# Altium PCB Phaser.PcbDoc (part 7 of 16)
Units mm, origin at the board's own origin, x right, y up, seen from the top; angles counter-clockwise.
Board outline 161.99 x 100 mm, 6 copper layers (TopLayer, MidLayer1, MidLayer2, SignalLayer1, Internal Plane 1, BottomLayer), stack 1.528 mm thick; 1017 components, 665 nets, 3453 pads, 2223 vias.
Unrouted connection lines stored in the file: 1.
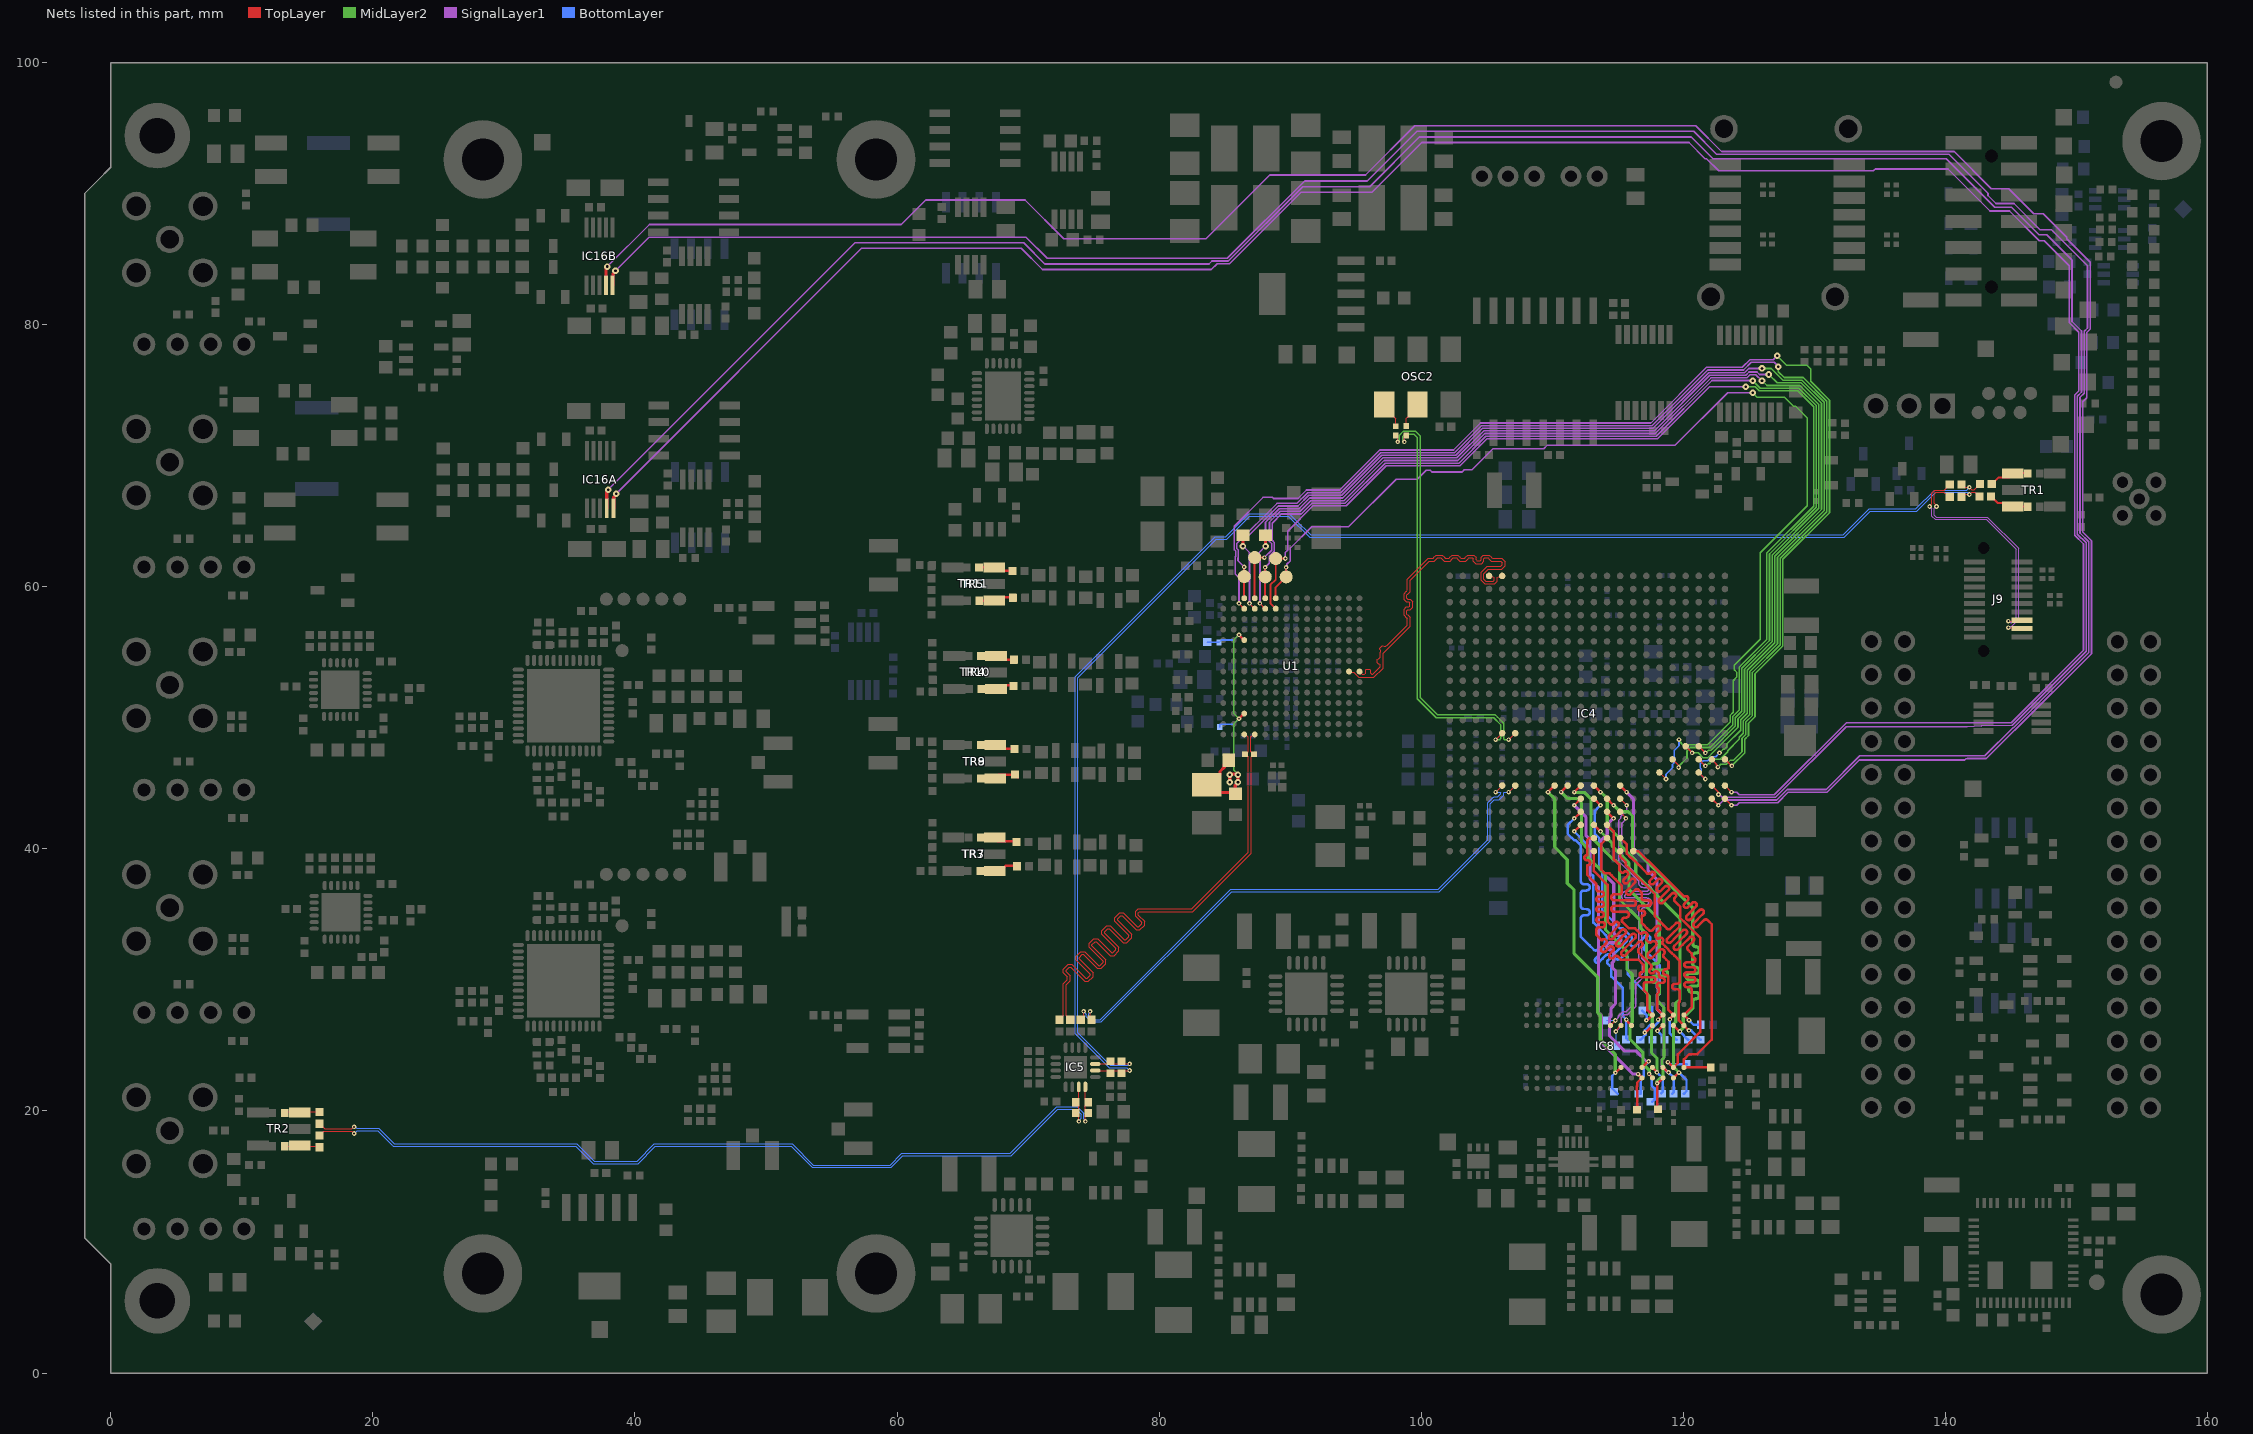
[diagram p9: the nets of this part, all layers, seen from the top]

## Via types
v1: diameter 0.5, hole 0.2, TopLayer to BottomLayer, tented both sides, 1374 vias
v2: diameter 0.35, hole 0.15, TopLayer to BottomLayer, tented both sides, 728 vias
v3: diameter 0.5, hole 0.2, TopLayer to BottomLayer, tented top, 96 vias
v4: diameter 0.6, hole 0.3, TopLayer to BottomLayer, 18 vias
v5: diameter 0.5, hole 0.2, TopLayer to BottomLayer, 5 vias
v6: diameter 0.35, hole 0.15, TopLayer to BottomLayer, 1 vias
v7: diameter 0.8, hole 0.5, TopLayer to BottomLayer, tented both sides, 1 vias

## Nets (pads, with @x,y where several pads share a name; then routed paths per layer and width w, separated by ;. In a path a pad name is that pad's centre, name@x,y a point inside that pad or via, vN(x,y) a via of type N, cw(c..) or ccw(c..) an arc to the next point about the centre after c; other vN are vias at no path point) (continued)
CH0_GAIN_A0: IC4.AB5 IC16B.4 | length 189.2
  TopLayer w0.125: IC4.AB5@123.175,43.825 v2(123.675,43.325)
  TopLayer w0.25: IC16B.4@37.8,83.005 37.8,84.33 v1(37.9,84.43)
  SignalLayer1 w0.127: v1(37.9,84.43) 41.107,87.637 60.32,87.637 62.196,89.512 69.769,89.512 72.724,86.558 83.575,86.558 88.431,91.415 95.747,91.415 99.499,95.167 120.955,95.167 122.917,93.204 140.664,93.204 143.501,90.367 144.837,90.367 146.744,88.46 147.471,88.46 149.259,86.671 149.259,86.545 151.047,84.756 151.047,79.66 150.788,79.401 150.788,74.427 150.474,74.113 150.474,64.18 151.142,63.512 151.142,54.895 145.286,49.039 145.27,49.039 143.119,46.887 141.661,46.887 ccw(c141.661,46.76) 141.586,46.863 141.468,46.777 133.425,46.777 130.977,44.329 128.005,44.329 127.2,43.524 124.269,43.524 124.07,43.325 v2(123.675,43.325)
CH0_GAIN_A1: IC4.AA5 IC16B.5 | length 187.3
  TopLayer w0.125: IC4.AA5@122.175,43.825 v2(122.675,43.325)
  TopLayer w0.25: IC16B.5@38.3,83.005 38.325,83.03 38.325,83.86 38.517,84.052 v1(38.517,84.12)
  SignalLayer1 w0.127: v1(38.517,84.12) 41.068,86.671 69.835,86.671 71.45,85.055 85.2,85.055 91.102,90.957 95.884,90.957 99.673,94.746 120.782,94.746 122.527,93.001 140.273,93.001 143.248,90.026 143.248,89.856 143.861,89.243 145.225,89.243 147.218,87.249 148.097,87.249 150.844,84.502 150.844,79.744 150.585,79.485 150.585,74.771 150.271,74.457 150.271,64.096 150.939,63.428 150.939,54.979 145.218,49.258 ; v2(122.675,43.325) 123.077,43.727 127.116,43.727 127.921,44.532 130.893,44.532 133.451,47.09 143.003,47.09 145.133,49.221
CH1_GAIN_A0: IC4.AA6 IC16A.4 | length 193.7
  TopLayer w0.125: IC4.AA6@122.175,44.825 122.639,44.361 122.639,44.188 v2(122.682,44.145)
  TopLayer w0.25: IC16A.4@37.85,65.98 37.85,67.305 v1(37.95,67.405)
  SignalLayer1 w0.127: v1(37.95,67.405) 56.789,86.244 69.658,86.244 71.274,84.628 83.809,84.628 84.033,84.852 85.284,84.852 90.962,90.53 96.061,90.53 99.85,94.319 120.605,94.319 122.26,92.664 140.051,92.664 143.764,88.951 145.04,88.951 147.137,86.854 147.723,86.854 149.627,84.95 149.651,84.917 149.652,84.874 149.652,80.243 150.382,79.513 150.382,74.855 150.067,74.541 150.067,64.012 150.736,63.343 150.736,55.063 145.135,49.463 cw(c145.045,49.553) 145.048,49.426 142.74,49.378 141.664,49.317 132.419,49.317 127.031,43.93 122.957,43.93 122.742,44.145 v2(122.682,44.145)
CH1_GAIN_A1: IC4.AB6 IC16A.5 | length 190.8
  TopLayer w0.125: IC4.AB6@123.175,44.825 v2(123.675,44.325)
  TopLayer w0.25: IC16A.5@38.375,66.005 38.375,66.835 38.567,67.027 v1(38.567,67.095)
  SignalLayer1 w0.127: v1(38.567,67.095) 57.289,85.817 69.481,85.817 71.097,84.201 83.986,84.201 84.434,84.649 85.368,84.649 90.823,90.103 96.238,90.103 100.027,93.892 120.428,93.892 121.657,92.664 121.767,92.664 122.694,91.737 129.656,91.737 129.661,91.732 134.492,91.732 134.635,91.875 140.189,91.875 143.392,88.672 144.881,88.672 147.159,86.394 147.537,86.394 149.449,84.482 149.449,80.158 150.178,79.429 150.178,74.939 149.864,74.625 149.864,63.928 150.533,63.259 150.533,55.147 145.015,49.63 132.444,49.63 126.947,44.133 124.262,44.133 124.07,44.325 v2(123.675,44.325)
CK_GTP_125_N: C237.1 OSC2.5 | length 2
  TopLayer w0.095: C237.1@98.856,72.25 98.856,72.84 98.993,72.977 99.721,73.705 OSC2.5@99.721,73.905
CK_GTP_125_P: C236.1 OSC2.4 | length 2
  TopLayer w0.095: OSC2.4@97.181,73.905 97.181,73.705 OSC2.4@97.908,72.977 ; OSC2.4@97.909,72.977 98.056,72.831 C236.1@98.056,72.245
CK_GTP_N: C26.2 IC4.E6 | length 42.6
  TopLayer w0.095: v2(74.738,27.591) 74.738,27.18 C26.2@74.958,26.96 ; v2(105.675,44.325) IC4.E6@106.175,44.825
  BottomLayer w0.095: v2(74.738,27.591) 74.738,27.522 74.624,27.409 74.624,27.255 74.905,26.975 75.514,26.975 85.453,36.914 101.289,36.914 105.084,40.709 105.084,43.52 105.502,43.939 105.546,43.939 105.582,43.975 105.853,43.975 106.069,44.191 106.069,44.269 106.013,44.325 v2@105.679,44.325
CK_GTP_P: C27.2 IC4.F6 | length 43.3
  TopLayer w0.095: C27.2@74.018,26.96 74.238,27.18 v2(74.238,27.591) ; v2(106.675,44.325) IC4.F6@107.175,44.825
  BottomLayer w0.095: v2(74.238,27.591) 74.238,27.564 74.44,27.362 74.44,27.179 74.775,26.845 74.828,26.791 75.59,26.791 85.529,36.73 101.365,36.73 105.267,40.633 105.267,43.444 105.521,43.697 105.524,43.697 105.582,43.755 105.944,43.755 106.289,44.1 106.289,44.269 106.344,44.325 v2(106.675,44.325)
CK_MMCX_IN_N: C194.1 R45.2 TR1.1 | length 3.1
  TopLayer w0.152: C194.1@143.485,66.875 143.719,66.641 143.744,66.641 143.997,66.388 144.87,66.388 TR1.1@145.148,66.11 146.263,66.11 R45.2@146.267,66.105
CK_MMCX_IN_P: C189.1 R73.2 TR1.3 | length 3.1
  TopLayer w0.152: C189.1@143.531,67.842 143.765,68.076 143.791,68.076 144.06,68.345 144.31,68.345 ; 144.31,68.346 144.844,68.346 145.158,68.66 146.252,68.66 R73.2@146.267,68.645
CK_MMCX_N: C194.2 C362.2 IC5.7 R47.1 R163.2 | length 112
  TopLayer w0.095: IC5.7@75.118,23.585 76.073,23.585 R47.1@76.293,23.805 76.513,23.585 76.898,23.585 R163.2@77.118,23.805 77.338,23.585 v2(77.749,23.585) ; C362.2@141.278,66.875 141.44,67.038 v2(141.828,67.038) 142.013,67.222 142.238,67.222 C194.2@142.585,66.875
  BottomLayer w0.095: v2(77.749,23.585) 77.636,23.471 76.274,23.471 73.787,25.958 73.787,53.036 84.364,63.613 85.151,63.613 86.926,65.388 89.864,65.388 91.48,63.772 132.288,63.772 134.267,65.752 137.811,65.752 139.253,67.195 141.645,67.195 141.802,67.038 v2(141.828,67.038)
CK_MMCX_P: C189.2 C359.2 IC5.6 R47.2 R163.1 | length 112.9
  TopLayer w0.095: IC5.6@75.118,23.085 76.073,23.085 R47.2@76.293,22.865 76.513,23.085 76.898,23.085 R163.1@77.118,22.865 77.338,23.085 v2(77.749,23.085) ; C359.2@141.231,67.842 141.483,67.591 v2(141.828,67.591) 142.013,67.406 142.195,67.406 C189.2@142.631,67.842
  BottomLayer w0.095: v2(77.749,23.085) 77.723,23.085 77.52,23.287 76.197,23.287 73.603,25.881 73.603,53.112 84.288,63.797 85.075,63.797 86.85,65.572 89.94,65.572 90.399,65.113 91.556,63.956 132.211,63.956 134.191,65.936 137.735,65.936 139.177,67.379 141.616,67.379 v2(141.828,67.591)
CK_SMA_IN_N: C81.1 R245.2 TR2.1 | length 2.7
  TopLayer w0.095: R245.2@13.27,19.845 13.35,19.925 C81.1@15.925,19.925
CK_SMA_IN_P: C54.1 R46.2 TR2.3 | length 2.7
  TopLayer w0.095: R46.2@13.27,17.3 14.385,17.3 14.39,17.305 15.845,17.305 C54.1@15.925,17.225
CK_SMA_N: C81.2 IC5.4 R22.2 R52.1 | length 66.5
  TopLayer w0.095: C81.2@15.925,19.025 16.328,18.622 18.392,18.622 18.55,18.78 v2(18.575,18.78) ; v2(74.368,19.203) 74.368,19.615 R22.2@74.588,19.835 74.368,20.055 74.368,20.44 R52.1@74.588,20.66 74.368,20.88 IC5.4@74.368,21.835
  BottomLayer w0.095: v2(18.575,18.78) 18.644,18.78 18.758,18.667 ; 18.811,18.667 20.457,18.667 20.516,18.607 21.642,17.481 35.556,17.481 36.879,16.158 40.161,16.158 41.484,17.481 52.013,17.481 53.621,15.873 59.475,15.873 60.362,16.76 68.621,16.76 72.186,20.325 73.739,20.325 74.254,19.81 74.254,19.385 74.368,19.272 v2(74.368,19.203)
CK_SMA_P: C54.2 IC5.3 R22.1 R52.2 | length 66.3
  TopLayer w0.095: C54.2@15.925,18.125 16.239,18.438 18.392,18.438 18.55,18.28 v2(18.575,18.28) ; v2(73.868,19.203) 73.868,19.615 R22.1@73.648,19.835 73.868,20.055 73.868,20.44 R52.2@73.648,20.66 73.868,20.88 IC5.3@73.868,21.835
  BottomLayer w0.095: v2(18.575,18.28) 18.602,18.28 18.804,18.483 20.381,18.483 21.489,17.374 ; 21.502,17.361 21.566,17.297 35.48,17.297 36.534,16.243 36.803,15.974 40.237,15.974 41.56,17.297 51.937,17.297 53.545,15.69 59.551,15.69 60.438,16.576 68.697,16.576 72.262,20.142 73.663,20.142 74.07,19.734 74.07,19.432 73.868,19.23 v2(73.868,19.203)
CKC_GTP_125_N: C237.2 IC4.E10 | length 31.7
  TopLayer w0.095: v2(98.706,71.052) 98.706,71.4 C237.2@98.856,71.55 ; v2(105.675,48.325) IC4.E10@106.175,48.825
  MidLayer2 w0.115: v2(98.706,71.052) 98.706,71.105 98.573,71.237 98.573,71.462 98.75,71.639 99.453,71.639 99.534,71.558 99.695,71.396 99.695,51.452 100.465,50.683 101.146,50.001 105.54,50.001 106.057,49.483 106.057,48.392 105.99,48.325 v2(105.675,48.325)
CKC_GTP_125_P: C236.2 IC4.F10 | length 32.4
  TopLayer w0.095: C236.2@98.056,71.545 98.206,71.395 v2(98.206,71.052) ; v2(106.675,48.325) IC4.F10@107.175,48.825
  MidLayer2 w0.115: v2(98.206,71.052) 98.206,71.105 98.338,71.237 98.338,71.559 98.653,71.874 99.55,71.874 99.93,71.494 99.93,51.55 101.244,50.236 105.637,50.236 105.818,50.055 106,49.874 106.292,49.581 106.292,48.392 106.36,48.325 v2(106.675,48.325)
CLKVDD1.2: C144.2 C304.2 C305.1 C306.2 C307.2 L11.1 U1.C12 U1.K12 | length 24.8
  TopLayer w0.2: v2(86.093,49.925) U1.C12@86.493,50.325 ; v2(86.093,56.325) U1.K12@86.493,55.925
  TopLayer w0.25: C306.2@85.318,46.75 84.968,46.4 84.968,46.224 84.644,45.9 84.644,45.675 83.869,44.9 C305.1@83.644,44.9 84.244,44.3 85.815,44.3 85.815,44.867 v1(86.013,45.066) v1@86.013,45.675 ; v1@85.349,45.066 85.378,45.095 v1@85.378,45.675 ; v1@85.378,45.701 v1@85.378,45.675 ; v1@86.013,45.701 85.404,45.701 v1@85.378,45.675
  MidLayer2 w0.125: v1@86.013,45.701 85.695,46.02 85.695,49.527 v2(86.093,49.925) 85.695,50.323 85.695,55.927 v2(86.093,56.325)
  BottomLayer w0.125: C307.2@83.671,55.775 83.696,55.75 C144.2@84.571,55.75 84.759,55.937 85.705,55.937 v2(86.093,56.325) ; C304.2@84.621,49.3 84.621,49.512 85.68,49.512 v2(86.093,49.925)
  other v1: 85.378,45.066 85.378,45.65 86.013,45.65
CPCIS_CLK_N: C362.1 J9.17 | length 18.2
  TopLayer w0.095: v2(139.318,66.121) 139.318,66.19 139.129,66.38 139.129,67.07 139.253,67.195 139.878,67.195 139.943,67.129 140.063,67.129 C362.1@140.325,66.867 ; v2(144.805,56.872) 145.758,56.872 J9.17@145.825,56.805
  SignalLayer1 w0.095: v2(139.318,66.121) 139.273,66.121 139.141,65.989 139.141,65.462 139.288,65.316 143.2,65.316 145.58,62.936 145.58,57.52 145.059,56.999 145.001,56.999 144.874,56.872 v2(144.805,56.872)
CPCIS_CLK_P: C359.1 J9.15 | length 18.2
  TopLayer w0.095: v2(138.793,66.121) 138.793,66.19 138.945,66.342 138.945,67.146 139.177,67.379 139.908,67.379 C359.1@140.325,67.795 ; v2(144.805,57.373) 145.758,57.373 J9.15@145.825,57.44
  SignalLayer1 w0.095: v2(138.793,66.121) 138.838,66.121 138.97,65.989 138.97,65.391 139.217,65.144 143.129,65.144 145.409,62.865 145.409,57.591 145.063,57.245 144.985,57.245 144.857,57.373 v2(144.805,57.373)
DAC_ALARM: IC4.AB8 U1.N12 | length 91.2
  TopLayer w0.125: v2(86.093,58.725) U1.N12@86.493,58.325 ; IC4.AB8@123.175,46.825 123.186,46.825 123.687,46.325 v2(123.698,46.325)
  MidLayer2 w0.125: v2(123.698,46.325) 123.698,46.334 124.679,47.315 124.679,48.352 124.973,48.647 124.973,49.591 125.471,50.089 125.471,53.368 127.584,55.481 127.584,62.085 131.146,65.647 131.146,74.239 129.716,75.67 129.716,76.441 129.708,76.448 129.708,76.632 129.437,76.903 127.872,76.903 v1(127.152,77.622)
  SignalLayer1 w0.125: v2(86.093,58.725) 86.093,60.694 85.813,60.974 85.813,62.299 85.84,62.326 85.84,62.718 85.731,62.827 85.731,64.617 87.929,66.814 88.645,66.814 88.73,66.729 90.6,66.729 91.246,67.375 93.772,67.375 96.831,70.434 102.458,70.434 104.514,72.491 117.524,72.491 121.77,76.736 124.505,76.736 125.088,77.319 126.849,77.319 v1(127.152,77.622)
DAC_CLK_N: C3.2 R88.2 U1.A11 | length 46.4
  TopLayer w0.095: C3.2@73.218,26.96 72.915,27.262 72.915,29.625 72.994,29.704 73.22,29.93 73.22,30.311 72.909,30.622 72.909,30.723 73.145,30.958 73.245,30.958 74.312,29.891 74.595,29.891 74.959,30.255 74.959,30.538 73.892,31.605 73.892,31.705 74.127,31.941 74.228,31.941 75.295,30.874 75.578,30.874 75.942,31.238 75.942,31.521 74.875,32.588 74.875,32.688 75.11,32.923 75.211,32.923 76.278,31.857 76.561,31.857 76.925,32.221 76.925,32.504 75.858,33.57 75.858,33.671 76.093,33.906 76.194,33.906 77.261,32.84 77.544,32.84 77.908,33.203 77.908,33.487 76.841,34.553 76.841,34.654 77.076,34.889 77.177,34.889 78.244,33.822 78.527,33.822 78.891,34.186 78.891,34.469 78.424,34.936 78.424,35.134 78.504,35.214 82.573,35.214 87.013,39.654 87.013,47.025 87.213,47.225 87.203,47.225 87.003,47.425 87.003,47.729 87.003,48.457 87.003,48.536 87.058,48.592 87.063,48.592 87.197,48.725 U1.A11@87.293,48.725
DAC_CLK_P: C4.2 R88.1 U1.A12 | length 46.4
  TopLayer w0.095: C4.2@72.393,26.96 72.695,27.262 72.695,29.716 72.76,29.781 72.839,29.86 73,30.021 73,30.22 72.689,30.531 72.689,30.814 73.053,31.178 73.336,31.178 74.403,30.111 74.504,30.111 74.739,30.346 74.739,30.447 73.672,31.513 73.672,31.797 74.036,32.161 74.319,32.161 75.386,31.094 75.487,31.094 75.722,31.329 75.722,31.43 74.655,32.496 74.655,32.779 75.019,33.143 75.302,33.143 76.369,32.077 76.47,32.077 76.705,32.312 76.705,32.413 75.638,33.479 75.638,33.762 76.002,34.126 76.285,34.126 77.352,33.06 77.453,33.06 77.688,33.295 77.688,33.395 76.621,34.462 76.621,34.745 76.985,35.109 77.268,35.109 78.335,34.042 78.435,34.042 78.671,34.278 78.671,34.378 78.204,34.844 78.204,35.226 78.348,35.369 78.412,35.434 82.481,35.434 86.793,39.745 86.793,47.025 R88.1@86.593,47.225 ; U1.A12@86.493,48.725 86.589,48.725 86.722,48.592 86.727,48.592 86.783,48.536 86.783,48.366 86.783,47.638 86.783,47.425 R88.1@86.583,47.225
DAC_OUTA_N: R2.2 R39.2 R269.1 TR3.1 TR7.1 | length 2.9
  TopLayer w0.19: R39.2@68.875,40.572 67.746,40.572 TR3.1@67.461,40.857 R2.2@66.621,40.857 ; R39.2@69.125,40.526 R39.2@69.125,40.566 ; R2.2@66.621,40.857 R2.2@66.392,40.857 R2.2@66.621,40.857
DAC_OUTA_P: R37.2 R59.2 R248.1 TR3.3 TR7.3 | length 3.4
  TopLayer w0.19: R248.1@69.062,38.783 R37.2@69.171,38.673 R248.1@69.128,38.63 ; R248.1@69.149,38.698 68.288,38.698 67.906,38.317 TR3.3@67.461,38.317 R59.2@66.57,38.317 ; R59.2@66.57,38.317 R59.2@66.341,38.317 R59.2@66.57,38.317
DAC_OUTB_N: R50.2 R54.2 R271.1 TR8.3 TR9.3 | length 3.1
  TopLayer w0.19: R271.1@68.889,45.663 67.787,45.663 TR9.3@67.502,45.378 R50.2@66.611,45.378 ; R271.1@69.022,45.661 R54.2@69.022,45.659 R271.1@69.228,45.453 ; R50.2@66.611,45.378 R50.2@66.382,45.378 R50.2@66.611,45.378
DAC_OUTB_P: R32.2 R40.2 R270.1 TR8.1 TR9.1 | length 3.3
  TopLayer w0.19: R32.2@66.382,47.918 66.611,47.918 TR9.1@67.502,47.918 67.777,47.643 68.455,47.643 68.479,47.62 68.86,47.62 R270.1@68.939,47.699 ; R270.1@68.817,47.788 68.887,47.718 R40.2@68.98,47.625 68.98,47.718 R270.1@68.98,47.811 ; R270.1@68.96,47.703 68.964,47.703 69.026,47.765 R270.1@69.09,47.83
DAC_OUTC_N: R66.2 R67.2 R273.1 TR4.1 TR10.1 | length 3.4
  TopLayer w0.19: R273.1@68.705,54.44 67.813,54.44 TR4.1@67.528,54.725 R66.2@66.637,54.725 ; R273.1@68.97,54.424 R273.1@68.97,54.486 ; R66.2@66.408,54.725 R66.2@66.637,54.725 ; R66.2@66.408,54.725 R66.2@66.637,54.725 ; R66.2@66.408,54.725 R66.2@66.637,54.725 ; R273.1@68.803,54.59 R67.2@68.938,54.455 R273.1@68.803,54.59 ; R273.1@68.803,54.59 68.77,54.59 R273.1@68.803,54.59
DAC_OUTC_P: R61.2 R62.2 R272.1 TR4.3 TR10.3 | length 2.7
  TopLayer w0.19: R62.2@66.433,52.185 TR4.3@67.528,52.185 67.813,52.47 R272.1@68.772,52.47 ; R272.1@68.888,52.418 R272.1@69.077,52.229
DAC_OUTD_N: R85.2 R86.2 R275.1 TR5.3 TR11.3 | length 3.8
  TopLayer w0.19: R85.2@66.278,58.928 66.508,58.928 TR5.3@67.424,58.928 ; R275.1@68.612,59.213 TR11.3@67.709,59.213 ; R275.1@68.837,59.158 68.837,59.138 R275.1@69.05,58.925 ; TR5.3@67.424,58.928 TR11.3@67.709,59.213 ; TR5.3@67.424,58.928 TR11.3@67.709,59.213 ; R275.1@68.644,58.946 R86.2@68.857,59.158 R275.1@68.644,58.946
DAC_OUTD_P: R76.2 R77.2 R274.1 TR5.1 TR11.1 | length 2.7
  TopLayer w0.19: R77.2@66.253,61.468 66.482,61.468 TR5.1@67.424,61.468 ; TR11.1@67.41,61.484 67.685,61.209 R274.1@68.534,61.209 ; R274.1@68.661,61.348 R76.2@68.824,61.185 ; R274.1@68.804,61.185 R274.1@68.804,61.205
DAC_RESETB: IC4.Y7 R36.1 U1.N10 | length 89.8
  TopLayer w0.125: v2(87.693,58.725) U1.N10@88.093,58.325 ; IC4.Y7@121.175,45.825 v2(121.675,45.325)
  TopLayer w0.25: v1(88.12,63.102) R36.1@88.12,63.927
  MidLayer2 w0.125: v2(122.758,47.325) 123.018,47.585 123.099,47.585 123.306,47.791 123.306,47.994 124.37,49.058 124.37,49.841 124.867,50.339 124.867,53.618 126.981,55.731 126.981,62.335 130.543,65.897 130.543,73.989 128.975,75.557 127.156,75.557 v1(126.52,76.193)
  SignalLayer1 w0.125: v2(87.693,58.725) 87.693,62.008 87.636,62.064 87.636,62.618 v1(88.12,63.102) 88.12,64.912 89.162,65.954 90.678,65.954 91.496,66.772 94.022,66.772 97.081,69.831 102.708,69.831 104.764,71.887 117.774,71.887 122.02,76.133 124.755,76.133 125.009,76.386 125.616,76.386 125.81,76.193 v1(126.52,76.193)
  BottomLayer w0.125: v2(121.675,45.325) 121.361,45.639 121.361,46.091 121.288,46.164 121.288,46.485 121.515,46.712 121.871,46.712 122.174,47.015 122.467,47.015 122.758,47.307 v2(122.758,47.325)
DAC_SCLK: B9.1 IC4.U7 U1.P9 | length 84.3
  TopLayer w0.125: IC4.U7@118.175,45.825 v2(118.675,45.325)
  TopLayer w0.152: U1.P9@88.893,59.125 88.892,59.126 88.892,59.949 B9.1@89.693,60.75 v2(89.693,61.481)
  MidLayer2 w0.125: v2(119.669,48.325) 119.669,48.264 119.824,48.109 119.824,48.056 119.943,47.937 121.836,47.937 123.565,49.667 123.565,50.174 123.805,50.414 123.805,52.833 124.063,53.091 124.063,53.486 123.884,53.664 123.884,54.001 125.866,55.983 125.866,62.594 129.45,66.178 129.45,72.877 128.568,73.758 128.42,73.758 127.734,74.444 125.638,74.444 v1(125.284,74.798)
  SignalLayer1 w0.125: v2(89.693,61.481) 89.732,61.52 89.732,61.705 90.016,61.989 90.016,62.957 91.634,64.575 94.45,64.575 98.082,68.207 99.706,68.207 100.375,68.876 100.696,68.876 100.818,68.754 103.125,68.754 103.292,68.922 103.866,68.922 105.478,70.533 109.353,70.533 109.628,70.808 119.393,70.808 123.383,74.798 v1(125.284,74.798)
  BottomLayer w0.125: v2(118.675,45.325) 118.675,45.69 119.17,46.185 119.17,46.439 119.319,46.588 119.319,46.985 119.297,47.007 119.297,47.499 119.669,47.871 v2(119.669,48.325)
DAC_SDENB: B12.1 IC4.Y9 U1.P10 | length 83.7
  TopLayer w0.125: IC4.Y9@121.175,47.825 v2(121.675,47.325)
  TopLayer w0.152: U1.P10@88.093,59.125 B12.1@88.093,60.75 v2(88.093,61.481)
  MidLayer2 w0.125: v2(121.675,47.325) 121.736,47.325 121.946,47.535 122.136,47.535 123.967,49.367 123.967,50.008 124.465,50.505 124.465,53.784 126.578,55.898 126.578,62.502 130.14,66.064 130.14,73.823 128.809,75.154 125.866,75.154 125.298,75.723 v1(125.284,75.723)
  SignalLayer1 w0.125: v2(88.093,61.481) 88.411,61.8 88.411,62.328 88.784,62.7 88.784,63.377 88.625,63.536 88.625,64.847 89.329,65.551 90.845,65.551 91.663,66.369 94.188,66.369 97.248,69.428 102.874,69.428 104.931,71.485 117.941,71.485 122.186,75.73 v1@125.284,75.73
DAC_SDIO: B10.1 IC4.W9 U1.P11 | length 86.9
  TopLayer w0.125: IC4.W9@120.175,47.825 v2(120.675,47.325)
  TopLayer w0.152: U1.P11@87.293,59.125 B10.1@87.293,62.225 v2(88.024,62.225)
  MidLayer2 w0.125: v2(120.675,47.325) 121.127,47.325 121.515,46.937 121.836,46.937 122.371,47.473 122.371,47.486 124.169,49.283 124.169,49.924 124.666,50.422 124.666,53.701 126.779,55.814 126.779,62.419 130.342,65.981 130.342,73.906 128.892,75.356 126.376,75.356 v1(126.001,75.73)
  SignalLayer1 w0.125: v2(88.024,62.225) 88.583,62.784 88.583,63.293 88.424,63.452 88.424,64.931 89.245,65.752 90.761,65.752 91.58,66.57 94.105,66.57 97.164,69.63 102.791,69.63 104.848,71.686 117.858,71.686 122.103,75.931 124.839,75.931 125.092,76.185 125.533,76.185 125.726,75.992 125.74,75.992 v1(126.001,75.73)
DAC_SDO: B11.1 IC4.AA8 U1.P12 | length 89.2
  TopLayer w0.125: IC4.AA8@122.175,46.825 122.175,46.818 122.53,46.464 122.53,46.39 122.631,46.289 v2(122.631,46.228)
  TopLayer w0.152: U1.P12@86.493,59.125 B11.1@86.493,60.775 v2(86.493,61.506)
  MidLayer2 w0.125: v2(122.631,46.228) 122.86,46.457 123.277,46.457 123.591,46.771 123.849,46.771 124.478,47.4 124.478,48.436 124.772,48.73 124.772,49.674 125.27,50.172 125.27,53.451 127.383,55.564 127.383,62.169 130.945,65.731 130.945,74.156 129.142,75.959 127.693,75.959 127.249,76.403 v1(127.249,76.797)
  SignalLayer1 w0.125: v2(86.493,61.506) 86.014,61.984 86.014,62.216 86.042,62.243 86.042,62.801 85.933,62.91 85.933,63.293 88.995,66.356 90.511,66.356 91.329,67.174 93.855,67.174 96.914,70.233 102.541,70.233 104.597,72.29 117.608,72.29 121.853,76.535 124.589,76.535 125.171,77.118 126.929,77.118 v1(127.249,76.797)
DAC_SLEEP: IC4.Y8 R231.1 U1.N11 | length 89.8
  TopLayer w0.125: v2(86.893,58.725) U1.N11@87.293,58.325 ; IC4.Y8@121.175,46.825 v2(121.675,46.325)
  TopLayer w0.25: v1(86.395,63.102) R231.1@86.395,63.927
  MidLayer2 w0.125: v2(121.675,46.325) 121.736,46.325 121.922,46.511 122.036,46.511 122.369,46.844 122.825,46.844 123.387,47.405 123.387,47.486 124.277,48.375 124.277,48.519 124.571,48.813 124.571,49.758 125.069,50.255 125.069,53.534 127.182,55.648 127.182,62.252 130.744,65.814 130.744,74.073 129.059,75.758 127.609,75.758 126.789,76.579 126.712,76.655 v1(126.001,76.655)
  SignalLayer1 w0.125: v2(86.893,58.725) 86.893,62.604 v1(86.395,63.102) 86.395,63.471 89.079,66.155 90.595,66.155 91.413,66.973 93.938,66.973 96.998,70.032 102.624,70.032 104.681,72.089 117.691,72.089 121.936,76.334 124.672,76.334 124.993,76.655 v1(126.001,76.655)
DAC_TXENA: B13.1 IC4.V8 U1.N9 | length 85.9
  TopLayer w0.125: IC4.V8@119.175,46.825 119.642,46.358 v2@119.642,46.195
  TopLayer w0.152: U1.N9@88.893,58.325 88.494,58.723 88.494,60.142 88.898,60.545 88.898,62.15 v2(89.629,62.15)
  MidLayer2 w0.125: v2(119.634,46.203) 119.677,46.246 119.677,46.327 120.274,46.924 120.274,47.471 120.538,47.736 122.052,47.736 123.766,49.45 123.766,50.091 124.264,50.589 124.264,53.868 126.377,55.981 126.377,62.585 129.939,66.147 129.939,73.726 128.722,74.942 125.793,74.942 125.476,75.26 v1(124.765,75.26)
  SignalLayer1 w0.125: v2(89.629,62.15) 89.629,62.611 89.809,62.792 89.809,64.231 91.746,66.168 94.272,66.168 97.331,69.227 102.958,69.227 105.014,71.284 118.024,71.284 122.001,75.26 v1(124.765,75.26)
DATA_CLK_N: IC4.D22 U1.G1 | length 25
  TopLayer w0.095: U1.G1@95.297,53.525 95.515,53.306 95.614,53.306 95.661,53.306 95.756,53.401 95.756,53.645 95.813,53.702 96.079,53.702 96.136,53.645 96.136,53.401 96.231,53.306 96.287,53.306 96.868,53.888 96.868,53.992 96.868,54.04 96.773,54.135 96.708,54.135 96.651,54.192 96.651,54.458 96.708,54.515 96.773,54.515 96.868,54.61 96.868,54.678 96.868,55.004 96.902,55.038 96.902,55.172 96.836,55.238 96.836,55.318 97.024,55.507 97.105,55.507 97.171,55.441 97.305,55.441 97.453,55.589 98.937,57.073 98.937,57.383 98.937,57.58 98.881,57.636 98.87,57.636 98.684,57.822 98.684,58.27 98.87,58.456 99.06,58.456 99.117,58.513 99.117,58.779 99.06,58.836 98.87,58.836 98.684,59.022 98.684,59.47 98.87,59.656 98.881,59.656 98.937,59.712 98.937,60.36 98.937,60.579 100.528,62.17 100.711,62.17 100.908,62.17 100.964,62.226 100.964,62.23 101.15,62.416 101.598,62.416 101.784,62.23 101.784,62.227 101.841,62.17 102.107,62.17 102.164,62.227 102.164,62.23 102.35,62.416 102.798,62.416 102.984,62.23 102.984,62.227 103.041,62.17 103.307,62.17 103.364,62.227 103.364,62.23 103.55,62.416 103.998,62.416 104.184,62.23 104.184,62.047 104.241,61.99 104.507,61.99 104.564,62.047 104.564,62.23 104.75,62.416 105.198,62.416 105.384,62.23 105.384,62.226 105.44,62.17 105.785,62.17 106.147,62.17 106.398,61.918 106.398,61.585 106.139,61.325 105.112,61.325 104.781,60.995 104.781,60.579 104.929,60.431 105.507,60.431 105.565,60.489 105.565,60.705 105.493,60.778 105.222,60.778 IC4.D22@105.175,60.825
DATA_CLK_P: IC4.E22 U1.G2 | length 25.1
  TopLayer w0.095: U1.G2@94.493,53.525 94.561,53.457 94.85,53.457 95.22,53.086 96.378,53.086 97.088,53.797 97.088,54.913 99.157,56.982 99.157,57.383 99.157,57.671 98.973,57.856 98.961,57.856 98.904,57.913 98.904,58.179 98.961,58.236 99.151,58.236 99.337,58.422 99.337,58.87 99.151,59.056 98.961,59.056 98.904,59.113 98.904,59.379 98.961,59.436 98.973,59.436 99.157,59.62 99.157,60.36 99.157,60.488 100.619,61.95 100.711,61.95 100.999,61.95 101.184,62.134 101.184,62.139 101.241,62.196 101.507,62.196 101.564,62.139 101.564,62.136 101.75,61.95 102.198,61.95 102.384,62.136 102.384,62.139 102.441,62.196 102.707,62.196 102.764,62.139 102.764,62.136 102.95,61.95 103.398,61.95 103.584,62.136 103.584,62.139 103.641,62.196 103.907,62.196 103.964,62.139 103.964,61.956 104.15,61.77 104.598,61.77 104.784,61.956 104.784,62.139 104.841,62.196 105.107,62.196 105.164,62.139 105.164,62.134 105.349,61.95 105.785,61.95 106.056,61.95 106.178,61.827 106.178,61.676 106.048,61.545 105.021,61.545 104.561,61.086 104.561,60.488 104.838,60.211 105.598,60.211 105.785,60.398 105.785,60.705 105.857,60.778 106.128,60.778 IC4.E22@106.175,60.825
DDR3_A0: IC4.L6 IC8.N3 R119.1 | length 27.6
  TopLayer w0.19: v2(111.675,44.325) IC4.L6@112.175,44.825 ; IC8.N3@117.641,23.32 117.644,23.32 117.98,22.985 v2(117.98,22.938)
  MidLayer2 w0.24: v2(111.675,44.325) 111.697,44.303 112.44,44.303 112.965,43.778 112.965,40.878 114.735,39.108 114.839,39.108 115.1,38.848 115.124,38.823 115.124,36.129 116.715,34.538 116.715,33.978 117.196,33.497 117.196,31.878 117.196,28.97 117.415,28.751 117.415,27.318 117.627,27.106 117.627,26.722 117.565,26.66 117.565,24.453 117.98,24.038 v2(117.98,22.938)
  BottomLayer w0.19: v2(117.98,22.938) 118.425,22.493 118.425,21.458 R119.1@118.315,21.348
DDR3_A1: IC4.M5 IC8.P7 R118.1 | length 24.6
  TopLayer w0.19: IC4.M5@113.175,43.825 v2(113.675,43.325) ; v2(118.024,26.103) IC8.P7@118.441,26.52
  BottomLayer w0.19: v2(113.675,43.325) 113.384,43.034 113.384,43.022 113.255,42.893 113.255,41.151 113.58,40.826 113.58,38.454 113.82,38.214 113.82,35.273 114.24,34.853 115.14,33.953 115.365,33.953 115.665,33.653 115.838,33.48 116.011,33.307 cw(c115.838,33.133) 116.011,32.96 ccw(c116.185,32.787) 116.011,32.614 ccw(c116.185,32.787) 116.358,32.614 116.531,32.787 117.066,33.321 cw(c117.239,33.148) 117.412,33.321 cw(c117.239,33.148) 117.412,32.975 117.051,32.614 ccw(c117.224,32.44) 117.051,32.267 117.215,32.103 118.215,31.103 118.215,28.97 118.021,28.776 118.021,28.428 118.508,27.941 118.508,26.587 v2(118.024,26.103) 118.565,25.562 R118.1@118.565,25.423
DDR3_A2: IC4.P6 IC8.P3 R117.1 | length 26.2
  TopLayer w0.19: IC4.P6@115.175,44.825 v2(115.675,44.325) ; IC8.P3@118.441,23.32 118.848,22.913 118.868,22.913 118.88,22.925 v2(118.88,22.938)
  SignalLayer1 w0.24: v2(115.675,44.325) 116.19,43.81 116.19,40.053 117.315,38.928 117.315,38.334 117.996,37.653 117.996,29.428 118.086,29.338 118.086,28.97 117.996,28.88 117.996,27.749 118.525,27.22 118.525,24.067 118.37,23.912 118.37,23.398 118.855,22.913 v2(118.88,22.938)
  BottomLayer w0.19: v2(118.88,22.938) 119.275,22.543 119.275,21.433 R117.1@119.14,21.298
DDR3_A3: IC4.K6 IC8.N2 R116.1 | length 28.3
  TopLayer w0.19: v2(110.678,44.325) 110.678,44.326 IC4.K6@111.175,44.825 IC4.K6@111.175,44.825 ; v2(117.395,22.824) 117.395,22.766 IC8.N2@117.641,22.52
  MidLayer2 w0.24: v2(110.678,44.325) 110.693,44.325 111.19,43.828 111.89,43.828 112.225,43.493 112.225,40.493 112.715,40.003 112.715,39.358 114.065,38.008 114.065,33.803 115.69,32.178 115.69,30.828 116.1,30.418 116.1,26.778 115.94,26.619 115.94,25.453 116.91,24.483 116.91,23.592 117.395,23.107 v2(117.395,22.824)
  BottomLayer w0.19: v2(117.395,22.824) 117.59,22.627 117.59,22.292 117.585,22.287 117.585,21.939 117.8,21.724 117.8,20.858 R116.1@117.64,20.698
DDR3_A4: IC4.M1 IC8.P8 R115.1 | length 27.5
  TopLayer w0.19: IC4.M1@113.175,39.825 113.175,39.428 113.175,38.293 114.215,37.253 114.215,34.453 114.39,34.278 ccw(c114.528,34.416) 114.666,34.278 114.758,34.37 cw(c114.896,34.232) 115.034,34.37 cw(c114.896,34.232) 115.034,34.094 114.804,33.864 114.362,33.423 ccw(c114.5,33.285) 114.362,33.147 ccw(c114.5,33.285) 114.638,33.147 115.079,33.589 115.294,33.803 cw(c115.432,33.666) 115.57,33.803 cw(c115.432,33.666) 115.57,33.528 115.355,33.313 114.914,32.871 ccw(c115.052,32.733) 114.914,32.596 ccw(c115.052,32.733) 115.19,32.596 115.631,33.037 116.054,33.46 cw(c116.192,33.322) 116.33,33.46 cw(c116.192,33.322) 116.33,33.184 115.907,32.761 115.31,32.165 ccw(c115.448,32.027) 115.31,31.889 ccw(c115.448,32.027) 115.586,31.889 116.183,32.485 116.556,32.859 cw(c116.693,32.721) 116.831,32.859 cw(c116.693,32.721) 116.831,32.583 116.596,32.348 ccw(c116.734,32.21) 116.596,32.072 116.64,32.028 117.315,31.353 117.376,31.292 117.513,31.155 cw(c117.376,31.017) 117.513,30.879 117.457,30.823 ccw(c117.595,30.685) 117.457,30.547 ccw(c117.595,30.685) 117.733,30.547 117.789,30.603 cw(c117.927,30.465) 118.065,30.603 118.14,30.528 118.14,30.348 ccw(c118.335,30.348) 118.335,30.153 118.387,30.153 cw(c118.387,29.958) 118.582,29.958 cw(c118.387,29.958) 118.387,29.763 118.14,29.763 ccw(c118.14,29.618) 117.995,29.618 117.995,29.518 ccw(c118.14,29.518) 118.14,29.373 118.14,29.178 118.14,29.059 118.021,28.94 118.021,28.283 118.025,28.279 118.025,27.961 118.021,27.957 118.021,27.74 IC8.P8@118.441,27.32 v2@118.086,26.964
  BottomLayer w0.19: R115.1@117.64,25.423 117.604,25.459 117.604,26.277 118.08,26.753 v2@118.08,26.913
  other v2: 118.079,26.964
DDR3_A5: IC4.M3 IC8.P2 R114.1 | length 27.8
  TopLayer w0.19: IC4.M3@113.175,41.825 v2(113.675,41.325) ; R114.1@118.071,20.142 118.005,20.208 118.005,21.541 118.025,21.561 118.025,21.879 118.005,21.899 v2(118.005,22.113) 118.014,22.113 118.024,22.103 IC8.P2@118.441,22.52
  MidLayer2 w0.24: v2(113.675,41.325) 114.565,40.435 114.565,40.203 115.84,38.928 115.84,36.928 118.165,34.603 118.165,32.128 118.165,31.473 cw(c117.925,31.473) 117.925,31.233 117.805,31.233 ccw(c117.805,30.993) 117.565,30.993 ccw(c117.805,30.993) 117.805,30.753 118.165,30.753 118.557,30.753 cw(c118.557,30.513) 118.797,30.513 cw(c118.557,30.513) 118.557,30.273 118.165,30.273 117.805,30.273 ccw(c117.805,30.033) 117.565,30.033 ccw(c117.805,30.033) 117.805,29.793 117.925,29.793 cw(c117.925,29.553) 118.165,29.553 118.165,28.955 117.996,28.786 117.996,28.418 118.525,27.889 118.525,24.067 118.37,23.912 118.37,23.544 118.435,23.479 118.435,22.693 118.005,22.263 v2(118.005,22.113)
DDR3_A6: IC4.N2 IC8.R8 R113.1 | length 28.1
  TopLayer w0.19: IC4.N2@114.175,40.825 113.74,40.39 113.74,38.403 113.99,38.153 114.34,38.153 114.365,38.128 114.521,37.972 114.832,37.661 115.143,37.35 115.315,37.178 115.315,36.958 115.315,36.738 cw(c115.095,36.738) 115.095,36.518 114.714,36.518 ccw(c114.714,36.298) 114.494,36.298 ccw(c114.714,36.298) 114.714,36.078 115.315,36.078 116.16,36.078 cw(c116.16,35.858) 116.38,35.858 cw(c116.16,35.858) 116.16,35.638 115.315,35.638 114.714,35.638 ccw(c114.714,35.418) 114.494,35.418 ccw(c114.714,35.418) 114.714,35.198 115.315,35.198 115.633,35.198 cw(c115.633,34.978) 115.853,34.978 cw(c115.633,34.978) 115.633,34.758 115.535,34.758 ccw(c115.535,34.538) 115.315,34.538 115.315,34.453 115.84,33.928 116.315,33.928 116.471,33.772 116.671,33.572 ccw(c116.782,33.682) 116.892,33.572 cw(c117.048,33.416) 117.203,33.572 cw(c117.048,33.416) 117.203,33.261 ; 117.202,33.26 ccw(c117.312,33.15) 117.202,33.04 117.344,32.899 ccw(c117.461,33.016) 117.578,32.899 cw(c117.733,32.743) 117.889,32.899 cw(c117.733,32.743) 117.889,32.588 117.772,32.471 117.337,32.036 ccw(c117.493,31.881) 117.337,31.725 ccw(c117.493,31.881) 117.648,31.725 118.083,32.16 118.193,32.27 cw(c118.348,32.114) 118.504,32.27 cw(c118.348,32.114) 118.504,31.958 ccw(c118.614,31.849) 118.504,31.739 118.705,31.538 118.861,31.382 ; 118.87,30.898 118.87,31.373 118.861,31.382 ; v2(118.97,26.991) 118.97,27.049 IC8.R8@119.241,27.32 118.857,27.704 118.857,28.424 118.861,28.428 118.861,30.153 118.861,30.179 ccw(c118.667,30.179) 118.667,30.373 cw(c118.667,30.593) 118.447,30.593 cw(c118.667,30.593) 118.667,30.813 ccw(c118.667,31.007) 118.861,31.007 118.861,31.253 118.861,31.382
  BottomLayer w0.19: v2(118.97,26.991) 118.97,25.923 R113.1@119.47,25.423 R113.1@119.49,25.423
DDR3_A7: IC4.M6 IC8.R2 R112.1 | length 27.6
  TopLayer w0.19: IC4.M6@113.175,44.825 v2(113.675,44.325) ; IC8.R2@119.241,22.52 119.649,22.928 v2(119.665,22.928)
  MidLayer2 w0.24: v2(113.675,44.325) 113.718,44.325 114.19,43.853 114.19,41.753 115.152,40.79 115.152,40.315 116.365,39.103 116.365,38.053 119.75,34.668 119.75,34.228 119.75,31.803 119.75,28.538 119.415,28.203 119.415,26.807 119.24,26.632 119.24,23.932 119.26,23.912 119.26,23.333 v2(119.665,22.928)
  BottomLayer w0.19: v2(119.665,22.928) 120.24,22.353 120.24,21.498 R112.1@120.04,21.298
DDR3_A8: IC4.P1 IC8.T8 R111.1 | length 28.3
  TopLayer w0.19: IC4.P1@115.175,39.825 115.175,39.418 115.615,38.978 115.615,38.739 117.815,36.539 117.815,34.836 118.473,34.178 118.744,33.907 ccw(c118.878,34.041) 119.013,33.907 119.42,34.314 cw(c119.554,34.179) 119.689,34.314 cw(c119.554,34.179) 119.689,34.045 119.147,33.504 118.785,33.142 ccw(c118.92,33.008) 118.785,32.873 ccw(c118.92,33.008) 119.054,32.873 119.416,33.235 119.957,33.776 cw(c120.092,33.642) 120.226,33.776 cw(c120.092,33.642) 120.226,33.508 119.684,32.966 119.323,32.605 ccw(c119.457,32.47) 119.323,32.336 ccw(c119.457,32.47) 119.592,32.336 119.953,32.697 120.495,33.239 cw(c120.629,33.105) 120.763,33.239 cw(c120.629,33.105) 120.763,32.97 120.356,32.563 ccw(c120.491,32.429) 120.356,32.294 120.491,32.16 120.625,32.026 120.625,31.908 ccw(c120.81,31.908) 120.81,31.723 120.728,31.723 cw(c120.728,31.533) 120.918,31.533 cw(c120.728,31.533) 120.728,31.343 120.625,31.343 120.262,31.343 ccw(c120.262,31.153) 120.072,31.153 ccw(c120.262,31.153) 120.262,30.963 120.625,30.963 120.728,30.963 cw(c120.728,30.773) 120.918,30.773 cw(c120.728,30.773) 120.728,30.583 120.625,30.583 120.262,30.583 ccw(c120.262,30.393) 120.072,30.393 ccw(c120.262,30.393) 120.262,30.203 120.625,30.203 120.728,30.203 cw(c120.728,30.013) 120.918,30.013 cw(c120.728,30.013) 120.728,29.823 120.625,29.823 120.262,29.823 ccw(c120.262,29.633) 120.072,29.633 ccw(c120.262,29.633) 120.262,29.443 120.435,29.443 cw(c120.435,29.253) 120.625,29.253 120.625,27.904 IC8.T8@120.041,27.32 v2(120.433,26.928)
  BottomLayer w0.19: v2(120.433,26.928) 120.783,26.578 R111.1@121.32,26.578
DDR3_A9: IC4.P2 IC8.R3 R110.1 | length 28.6
  TopLayer w0.19: IC4.P2@115.184,40.825 115.694,40.315 115.694,39.622 115.981,39.335 116.016,39.335 116.524,38.827 117.206,38.145 ccw(c117.34,38.28) 117.474,38.145 117.518,38.189 cw(c117.653,38.055) 117.787,38.189 cw(c117.653,38.055) 117.787,37.92 117.609,37.742 117.468,37.602 ccw(c117.603,37.467) 117.468,37.333 ccw(c117.603,37.467) 117.737,37.333 117.877,37.474 118.056,37.652 cw(c118.19,37.517) 118.324,37.652 cw(c118.19,37.517) 118.324,37.383 118.146,37.205 118.006,37.064 ccw(c118.14,36.93) 118.006,36.796 ccw(c118.14,36.93) 118.274,36.796 118.415,36.936 118.593,37.114 cw(c118.727,36.98) 118.862,37.114 cw(c118.727,36.98) 118.862,36.846 118.684,36.667 118.177,36.161 ccw(c118.311,36.026) 118.177,35.892 ccw(c118.311,36.026) 118.445,35.892 118.952,36.399 119.131,36.577 cw(c119.265,36.443) 119.399,36.577 cw(c119.265,36.443) 119.399,36.308 119.355,36.264 ccw(c119.49,36.13) 119.355,35.996 119.49,35.861 119.624,35.727 119.624,35.726 119.76,35.589 119.76,34.733 120.207,34.286 120.216,34.286 120.481,34.021 120.481,34.012 120.758,33.735 120.767,33.735 121.273,33.229 121.273,33.213 ; v2@118.824,23.728 118.833,23.728 IC8.R3@119.241,23.32 119.25,23.32 119.574,23.644 119.574,24.32 121.274,26.02 121.274,33.213
  BottomLayer w0.19: v2(118.815,23.728) 118.965,23.578 R110.1@120.27,23.578
DDR3_A10: IC4.L4 IC8.L7 R109.1 | length 25.1
  TopLayer w0.19: v2(111.675,42.325) IC4.L4@112.175,42.825 ; v2(115.655,26.963) 115.598,26.963 IC8.L7@116.041,26.52
  BottomLayer w0.19: v2(111.675,42.325) 111.165,41.815 111.165,41.153 111.66,40.658 111.778,40.658 112.022,40.414 112.04,40.414 112.165,40.289 112.165,37.553 ccw(c112.41,37.553) 112.41,37.308 112.606,37.308 cw(c112.606,37.063) 112.851,37.063 cw(c112.606,37.063) 112.606,36.818 112.41,36.818 ccw(c112.41,36.573) 112.165,36.573 112.165,36.503 112.165,35.653 ccw(c112.41,35.653) 112.41,35.408 112.606,35.408 cw(c112.606,35.163) 112.851,35.163 cw(c112.606,35.163) 112.606,34.918 112.405,34.918 ccw(c112.405,34.678) 112.165,34.678 112.165,33.303 112.84,32.628 113.171,32.296 ccw(c113.306,32.431) 113.44,32.296 113.57,32.427 cw(c113.705,32.292) 113.839,32.427 cw(c113.705,32.292) 113.839,32.158 113.575,31.893 113.31,31.629 ccw(c113.444,31.495) 113.31,31.36 ccw(c113.444,31.495) 113.579,31.36 113.843,31.625 114.108,31.889 cw(c114.242,31.755) 114.377,31.889 cw(c114.242,31.755) 114.377,31.621 114.246,31.49 ccw(c114.381,31.356) 114.246,31.222 114.381,31.087 114.515,30.953 114.515,30.256 115.393,29.378 115.393,27.224 v2(115.655,26.963) 115.655,25.558 R109.1@115.79,25.423
DDR3_A11: IC4.N5 IC8.R7 R108.1 | length 26.7
  TopLayer w0.19: IC4.N5@114.175,43.825 v2(114.675,43.325) ; IC8.R7@119.241,26.52 119.257,26.52 119.714,26.063 v2(119.73,26.063)
  MidLayer2 w0.24: v2(114.675,43.325) 115.172,42.828 115.801,42.828 116.12,42.509 116.12,40.108 116.115,40.103 120.715,35.503 120.715,33.633 120.715,32.768 ccw(c120.955,32.768) 120.955,32.528 120.962,32.528 cw(c120.962,32.288) 121.202,32.288 cw(c120.962,32.288) 120.962,32.048 120.955,32.048 ccw(c120.955,31.808) 120.715,31.808 120.715,31.568 120.715,31.328 120.715,31.199 ccw(c120.955,31.199) 120.955,30.959 120.962,30.959 cw(c120.962,30.719) 121.202,30.719 cw(c120.962,30.719) 120.962,30.479 120.715,30.479 120.468,30.479 ccw(c120.468,30.239) 120.228,30.239 ccw(c120.468,30.239) 120.468,29.999 120.715,29.999 120.962,29.999 cw(c120.962,29.759) 121.202,29.759 cw(c120.962,29.759) 120.962,29.519 120.715,29.519 120.637,29.519 ccw(c120.637,29.279) 120.397,29.279 ccw(c120.637,29.279) 120.637,29.039 120.715,29.039 120.962,29.039 cw(c120.962,28.799) 121.202,28.799 cw(c120.962,28.799) 120.962,28.559 120.955,28.559 ccw(c120.955,28.319) 120.715,28.319 120.715,28.079 120.715,27.839 119.988,27.112 119.988,26.348 119.73,26.09 v2(119.73,26.063)
  BottomLayer w0.19: v2(119.73,26.063) R108.1@120.37,25.423
DDR3_A12: IC4.L3 IC8.N7 R107.1 | length 24
  TopLayer w0.19: v2(111.675,41.325) IC4.L3@112.175,41.825 ; v2(117.055,25.988) 117.109,25.988 IC8.N7@117.641,26.52
  BottomLayer w0.19: v2(111.675,41.325) 112.89,40.11 112.89,38.168 113.13,37.928 113.13,34.364 114.015,33.479 114.071,33.423 cw(c113.863,33.214) 114.071,33.005 ; 114.07,33.005 ccw(c114.279,32.796) 114.07,32.587 ccw(c114.279,32.796) 114.488,32.587 114.697,32.797 115.203,33.303 cw(c115.412,33.095) 115.621,33.303 cw(c115.412,33.095) 115.621,32.886 115.114,32.38 114.792,32.057 ccw(c115,31.848) 114.792,31.64 ccw(c115,31.848) 115.209,31.64 115.323,31.754 cw(c115.531,31.545) 115.74,31.754 115.74,30.428 117.265,28.903 117.265,28.228 117.59,27.903 117.615,27.903 117.615,27.092 ; R107.1@116.715,25.423 117.12,25.828 117.12,25.922 v2(117.055,25.988) 117.055,26.14 117.61,26.695 117.61,27.087
DDR3_A13: IC4.R1 IC8.T3 R106.1 | length 28.4
  TopLayer w0.19: IC4.R1@116.175,39.825 116.561,39.825 117.277,39.11 117.297,39.11 119.922,36.485 120.059,36.347 cw(c120.181,36.225) 120.303,36.347 120.335,36.315 cw(c120.213,36.193) 120.335,36.071 120.088,35.824 ccw(c120.226,35.686) 120.088,35.548 ccw(c120.226,35.686) 120.364,35.548 120.611,35.795 120.685,35.87 cw(c120.823,35.732) 120.961,35.87 cw(c120.823,35.732) 120.961,35.594 120.887,35.519 120.265,34.898 ccw(c120.403,34.76) 120.265,34.622 ccw(c120.403,34.76) 120.541,34.622 121.162,35.244 121.24,35.321 cw(c121.377,35.183) 121.515,35.321 cw(c121.377,35.183) 121.515,35.045 121.438,34.968 120.817,34.346 ccw(c120.955,34.208) 120.817,34.071 ccw(c120.955,34.208) 121.093,34.071 121.576,34.554 cw(c121.714,34.416) 121.852,34.554 121.99,34.416 122.165,34.241 122.165,34.053 122.165,27.453 122.165,25.444 121.057,24.336 120.448,24.336 120.041,23.929 IC8.T3@120.041,23.32 ; IC8.T3@120.044,23.323 120.064,23.343 122.086,23.343 R106.1@122.103,23.326
DDR3_A14: IC4.N3 IC8.T7 R105.1 | length 26.9
  TopLayer w0.19: IC4.N3@114.175,41.825 114.675,41.325 114.675,39.237 115.099,38.812 115.099,38.369 115.215,38.253 115.245,38.223 ccw(c115.353,38.331) 115.461,38.223 cw(c115.598,38.085) 115.736,38.223 cw(c115.598,38.085) 115.736,37.947 115.629,37.839 115.476,37.687 ccw(c115.614,37.549) 115.476,37.411 ccw(c115.614,37.549) 115.752,37.411 115.904,37.564 116.012,37.671 cw(c116.15,37.533) 116.288,37.671 cw(c116.15,37.533) 116.288,37.395 116.18,37.288 115.707,36.815 ccw(c115.845,36.677) 115.707,36.539 ccw(c115.845,36.677) 115.983,36.539 116.318,36.874 cw(c116.456,36.736) 116.594,36.874 116.732,36.736 116.82,36.648 116.82,36.453 116.82,36.258 ccw(c117.015,36.258) 117.015,36.063 117.341,36.063 cw(c117.341,35.868) 117.536,35.868 cw(c117.341,35.868) 117.341,35.673 116.82,35.673 116.74,35.673 ccw(c116.74,35.478) 116.545,35.478 ccw(c116.74,35.478) 116.74,35.283 116.82,35.283 116.879,35.283 cw(c116.879,35.088) 117.074,35.088 cw(c116.879,35.088) 116.879,34.893 ccw(c116.879,34.834) 116.82,34.834 116.82,34.503 116.82,34.348 116.958,34.21 117.234,33.934 117.372,33.796 ccw(c117.509,33.934) 117.647,33.796 117.916,34.065 cw(c118.054,33.927) 118.191,34.065 cw(c118.054,33.927) 118.191,33.789 117.923,33.521 ccw(c118.061,33.383) 117.923,33.245 118.004,33.164 ccw(c118.061,33.222) 118.118,33.164 cw(c118.256,33.026) 118.394,33.164 cw(c118.256,33.026) 118.394,32.889 ccw(c118.451,32.831) 118.394,32.774 118.565,32.603 118.627,32.54 119.102,32.065 119.311,31.857 119.587,31.581 119.725,31.443 119.725,31.248 119.725,30.858 119.725,30.468 119.725,30.078 119.725,29.883 cw(c119.53,29.883) 119.53,29.688 119.335,29.688 ccw(c119.335,29.493) 119.14,29.493 ccw(c119.335,29.493) 119.335,29.298 119.53,29.298 cw(c119.53,29.103) 119.725,29.103 119.725,28.347 119.657,28.279 119.657,26.904 IC8.T7@120.041,26.52 v2(120.415,26.146)
  BottomLayer w0.19: v2(120.415,26.146) 120.592,26.146 R105.1@121.315,25.423
DDR3_BA0: IC4.L5 IC8.M2 R101.1 | length 26.5
  TopLayer w0.19: v2(111.675,43.325) IC4.L5@112.175,43.825 ; R101.1@116.471,20.104 116.471,21.547 116.457,21.561 116.457,21.879 116.471,21.893 116.471,22.15 IC8.M2@116.841,22.52 116.555,22.806 v2(116.555,22.813)
  SignalLayer1 w0.24: v2(111.675,43.325) 112.565,42.435 112.565,41.025 112.865,40.725 112.865,37.728 113.515,37.078 113.515,32.628 113.515,30.278 113.515,27.478 113.74,27.253 113.74,25.228 115.685,23.283 115.689,23.283 116.159,22.813 v2(116.555,22.813)
DDR3_BA1: IC4.M2 IC8.N8 R100.1 | length 26.5
  TopLayer w0.19: IC4.M2@113.175,40.825 112.837,40.825 112.669,40.657 112.669,40.028 112.669,39.908 112.669,39.548 cw(c112.639,39.548) 112.639,39.518 ccw(c112.639,39.323) 112.444,39.323 ccw(c112.639,39.323) 112.639,39.128 112.669,39.128 112.701,39.128 cw(c112.701,38.933) 112.896,38.933 cw(c112.701,38.933) 112.701,38.738 ccw(c112.701,38.706) 112.669,38.706 112.669,38.348 112.669,38.153 112.669,38.004 113.365,37.308 113.365,37.203 113.365,37.133 113.365,36.938 ccw(c113.56,36.938) 113.56,36.743 113.741,36.743 cw(c113.741,36.548) 113.936,36.548 cw(c113.741,36.548) 113.741,36.353 113.56,36.353 ccw(c113.56,36.158) 113.365,36.158 ccw(c113.56,36.158) 113.56,35.963 113.741,35.963 cw(c113.741,35.768) 113.936,35.768 cw(c113.741,35.768) 113.741,35.573 113.56,35.573 ccw(c113.56,35.378) 113.365,35.378 ccw(c113.56,35.378) 113.56,35.183 113.741,35.183 cw(c113.741,34.988) 113.936,34.988 cw(c113.741,34.988) 113.741,34.793 113.56,34.793 ccw(c113.56,34.598) 113.365,34.598 ccw(c113.56,34.598) 113.56,34.403 113.809,34.403 cw(c113.809,34.208) 114.004,34.208 cw(c113.809,34.208) 113.809,34.013 113.56,34.013 ccw(c113.56,33.818) 113.365,33.818 113.365,33.623 113.365,33.428 113.64,33.153 113.746,33.047 ccw(c113.778,33.078) 113.809,33.047 cw(c113.947,32.909) 114.085,33.047 cw(c113.947,32.909) 114.085,32.771 114.054,32.739 113.769,32.455 ccw(c113.907,32.317) 113.769,32.179 ccw(c113.907,32.317) 114.045,32.179 114.329,32.464 114.361,32.495 cw(c114.499,32.357) 114.637,32.495 cw(c114.499,32.357) 114.637,32.219 114.605,32.188 114.385,31.968 ccw(c114.523,31.83) 114.385,31.692 ccw(c114.523,31.83) 114.661,31.692 114.743,31.774 cw(c114.881,31.636) 115.019,31.774 115.157,31.636 115.215,31.578 115.24,31.553 115.84,31.553 115.974,31.553 116.364,31.553 116.559,31.553 116.965,31.147 116.965,30.991 116.965,30.706 cw(c116.86,30.706) 116.86,30.601 ccw(c116.86,30.406) 116.665,30.406 ccw(c116.86,30.406) 116.86,30.211 116.965,30.211 117.666,30.211 cw(c117.666,30.016) 117.861,30.016 cw(c117.666,30.016) 117.666,29.821 117.16,29.821 ccw(c117.16,29.626) 116.965,29.626 116.965,29.431 116.965,29.236 117.261,28.94 117.261,28.283 117.257,28.279 117.257,27.961 117.261,27.957 117.261,27.7 IC8.N8@117.641,27.32 117.235,26.914 v2@117.19,26.914
  BottomLayer w0.19: R100.1@116.848,27.657 117.19,27.316 v2@117.19,26.914
  other v2: 117.182,26.92
DDR3_BA2: IC4.N4 IC8.M3 R99.1 | length 27.2
  TopLayer w0.19: IC4.N4@114.175,42.825 v2(114.675,42.325) ; IC8.M3@116.841,23.32 117.297,23.776 v2(117.355,23.776)
  SignalLayer1 w0.24: v2(114.675,42.325) 114.637,42.325 114.19,41.878 114.19,41.121 113.72,40.651 113.72,38.304 114.69,37.334 114.69,34.383 114.69,33.648 ccw(c114.96,33.648) 114.96,33.378 114.97,33.378 cw(c114.97,33.108) 115.24,33.108 cw(c114.97,33.108) 114.97,32.838 114.69,32.838 114.42,32.838 ccw(c114.42,32.568) 114.15,32.568 ccw(c114.42,32.568) 114.42,32.298 cw(c114.42,32.028) 114.69,32.028 114.69,31.432 114.57,31.312 114.57,30.944 114.825,30.689 114.825,28.187 114.485,27.847 114.485,27.202 114.37,27.087 114.37,25.733 114.365,25.728 115.528,24.565 116.403,24.565 117.191,23.776 v2(117.355,23.776)
  BottomLayer w0.19: R99.1@116.745,21.298 116.74,21.303 116.74,22.404 116.975,22.639 116.975,23.366 117.355,23.746 v2(117.355,23.776)
DDR3_CAS_N: IC4.J6 IC8.K3 R103.1 | length 26.8
  TopLayer w0.19: v2(109.675,44.325) IC4.J6@110.175,44.825 ; v2(114.805,22.913) 114.834,22.913 IC8.K3@115.241,23.32
  MidLayer2 w0.24: v2(109.675,44.325) 110.185,43.815 110.185,40.206 110.165,40.186 110.165,40.153 111.14,39.178 111.14,37.378 111.665,36.853 111.665,32.003 113.465,30.203 113.465,27.503 113.66,27.308 113.66,25.458 114.805,24.313 v2(114.805,22.913)
  BottomLayer w0.19: v2(114.805,22.913) 114.575,22.683 114.575,21.711 R103.1@114.991,21.295
DDR3_CK_N: IC4.P4 IC8.K7 R121.2 | length 25.2
  TopLayer w0.095: v2@114.855,26.134 IC8.K7@115.241,26.52 ; IC4.P4@115.175,42.825 v2@115.615,42.385
  SignalLayer1 w0.115: v2(114.855,26.063) 115.272,26.48 115.272,27.121 115.496,27.345 115.737,27.345 116.365,27.973 116.365,29.621 117.084,30.339 117.084,31.384 116.825,31.643 116.825,35.359 cw(c116.965,35.359) 116.965,35.499 117.21,35.499 ccw(c117.21,35.874) 117.21,36.249 115.669,36.249 cw(c115.669,36.389) 115.669,36.529 117.21,36.529 ccw(c117.21,36.904) 117.21,37.279 116.965,37.279 cw(c116.965,37.419) 116.825,37.419 116.825,37.643 115.292,39.175 115.292,41.942 115.615,42.265 v2(115.615,42.328)
  BottomLayer w0.095: R121.2@114.885,24.978 v2@114.885,26.032
DDR3_CK_P: IC4.P5 IC8.J7 R120.2 | length 25.1
  TopLayer w0.095: IC8.J7@114.441,26.52 114.441,26.524 114.815,26.898 v2(114.815,26.903) ; IC4.P5@115.175,43.825 v2(115.675,43.325)
  SignalLayer1 w0.115: v2(114.815,26.903) 115.037,27.125 115.037,27.219 115.399,27.58 115.64,27.58 116.13,28.07 116.13,29.718 116.849,30.437 116.849,31.287 116.59,31.546 116.59,35.359 cw(c116.965,35.359) 116.965,35.734 117.21,35.734 ccw(c117.21,35.874) 117.21,36.014 115.669,36.014 cw(c115.669,36.389) 115.669,36.764 117.21,36.764 ccw(c117.21,36.904) 117.21,37.044 116.965,37.044 cw(c116.965,37.419) 116.59,37.419 116.59,37.546 115.057,39.078 115.057,42.167 115.232,42.342 115.232,42.486 115.457,42.71 115.522,42.71 115.675,42.863 v2(115.675,43.325)
  BottomLayer w0.095: R120.2@114.17,26.903 v2(114.815,26.903)